# Altium PCB PCB1.PcbDoc (part 3 of 3)
Units mil, origin at the board's own origin, x right, y up, seen from the top; angles counter-clockwise.
Board outline 4825 x 2725 mil, 2 copper layers (Top Layer, Bottom Layer); 148 components, 112 nets, 484 pads, 116 vias.
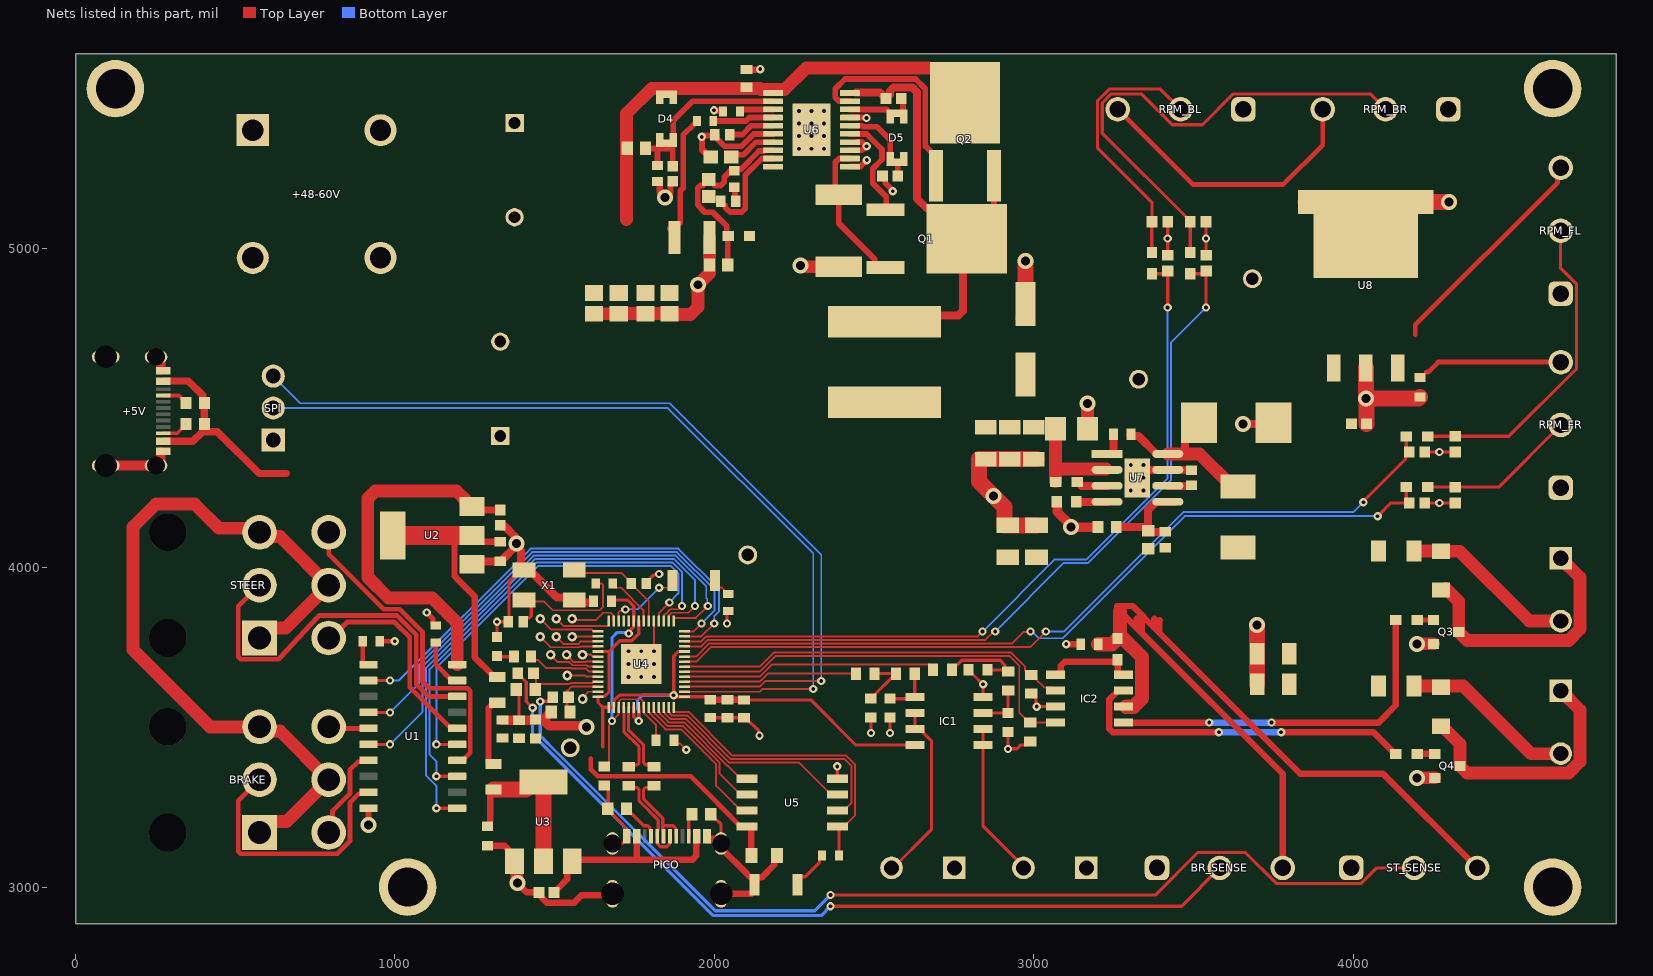
[diagram p2: the nets of this part, all layers, seen from the top]

## Part data (continued)
R34: library part CMP-03412-022575-2, "RES 100KΩ 1.00% 0.1W 0603", Case/Package=0603, Resistance=100kR, Tolerance=1%, RoHS Compliant=Yes
R35: library part CMP-02407-004872-1, "RES Thick Film, 68.1kΩ, 1%, 0.1W, 100ppm/°C, 0603", Case/Package=0603, Manufacturer=YAGEO, Manufacturer Part Number=RC0603FR-0768K1L, Max Operating Temperature=155°C, Max Power Dissipation=100mW, Min Operating Temperature=-55°C, Package Quantity=20000, Resistance=68.1kR, Temperature Coefficient=100ppm/°C, Tolerance=1%, Composition="Thick Film", Contact Plating=Tin, Depth=0.85mm, Features="Automotive AEC-Q200", Height=0.02inch, Lead Free="Lead Free", Length=0.061inch, Military Standard=Not, Number of Terminations=2, Packaging="Tape and Reel", Radiation Hardening=No, Width=0.033inch
R36 R39 R44 R45: library part CMP-03412-031710-1, "RES SMD 5.23K OHM 0.1% 1/10W", Manufacturer=Yageo, Package=RT0603, Power Rating=0.1W, Resistance=5.23KΩ, Temperature="-55°C to +155°C", Temperature Coefficient="25 ppm/°C", Temperature Range High=+155°C, Temperature Range Low=-55°C, Tolerance=0.001, Voltage Rating=75V, Automotive=No, Category=Res, ComponentLink2Description=Datasheet, ComponentLink2URL=http://www.yageo.com/documents/recent/PYu-RT_1-to-0.01_RoHS_L_9.pdf, Composition="Thin Film", Device Class L1="Passive Components", Device Class L2=Resistors, Device Class L3="Chip SMD Resistors", Digikey Description="RES SMD 5.23K OHM 0.1% 1/10W", Footprint Url=http://www.yageo.com/exep/pages/download/literatures/PYu-R_Mount_10.pdf, Height=0.55mm, Ipc Land Pattern Name=RESC16080X45, Lead Free=Yes, Manufacturer Part Number=RT0603BRD075K23L, Mouser Description="Thin Film Resistors 1/10W 5.23K ohm .1% 25ppm", Octopart=https://octopart.com/rt0603brd075k23l-yageo-1448416, RoHS=TRUE, Series=RT
R37 R40 R48 R49: library part CMP-2000-00874-2, "RES SMD 10K OHM 0.1% 1/10W 0603", Case Code (Imperial)=0603, Case Code (Metric)=1608, Max Operating Temperature=155°C, Max Power Dissipation=100mW, Min Operating Temperature=-55°C, Package Quantity=5000, Resistance=10kR, Resistance Tolerance=0.1%, Resistor Type="Thin Film", Temperature Coefficient=25ppm/°C, Voltage Rating=75V, Case/Package=0603, Construction=Rectangular, Contact Plating=Tin, Depth=0.8mm, Height=0.45mm, Lead Free="Lead Free", Length=1.6mm, Military Standard=Not, Mount="Surface Mount", Number of Pins=2, Number of Terminations=2, Packaging="Tape and Reel", Power Rating=100mW, Radiation Hardening=No, REACH SVHC="No SVHC", RoHS Compliant=Yes, Series=ERA-3A, Size Code=0603, Technology="METAL FILM", Termination=SMD/SMT, Tolerance=0.1%, Voltage Rating (DC)=75V, Width=0.8mm
R42 R43: library part CMP-03412-032644-1, "RES SMD 47 OHM 1% 1/10W 0603", Manufacturer=Yageo, Manufacturer Part Number=RT0603FRE0747RL, Package=RT0603, Power Rating=0.1W, Resistance=47Ω, Temperature="-55°C to +155°C", Temperature Coefficient="50 ppm/°C", Temperature Range High=+155°C, Temperature Range Low=-55°C, Tolerance=0.01, Voltage Rating=75V, Automotive=No, Category=Res, ComponentLink2Description=Datasheet, ComponentLink2URL=http://www.yageo.com/documents/recent/PYu-RT_1-to-0.01_RoHS_L_9.pdf, Composition="Thin Film", Device Class L1="Passive Components", Device Class L2=Resistors, Device Class L3="Chip SMD Resistors", Digikey Description="RES SMD 47 OHM 1% 1/10W 0603", Footprint Url=http://www.yageo.com/exep/pages/download/literatures/PYu-R_Mount_10.pdf, Height=0.55mm, Ipc Land Pattern Name=RESC16080X45, Lead Free=Yes, Mouser Description="RT Series 0603 0.1 W 47 Ohm ±1 % ±50 ppm/°C SMT Thin Film Chip Resistor", Octopart=https://octopart.com/rt0603fre0747rl-yageo-39813773, RoHS=TRUE, Series=RT
SPI: library part CMP-04776-000327-1, "CONN HEADER VERT 3POS 2.54MM", Color=Natural, Contact Resistance=10mR, Current Rating=4A, Housing Color=White, Max Operating Temperature=75°C, Min Operating Temperature=0°C, Voltage Rating=250V, Connector Type="Male Pin", Contact Material=Brass, Contact Mating Length=0.295inch, Contact Plating=Gold, Contact Type="Male Pin", Depth=5.8mm, Fastening Type=Friction, Gender=Male, Housing Material=Nylon, Lead Pitch=2.54mm, Length=7.62mm, Mount="Through Hole", Number of Contacts=3, Number of Positions=3, Number of Rows=1, Orientation=Straight, Packaging=Bulk, Pitch=2.54mm, Radiation Hardening=No, RoHS Compliant=Yes, Series="KK® 6410", Termination=Solder, Working Voltage=250V
U1: library part CMP-0440-01048-3, "Octal Buffers/Drivers With 3-State Outputs, NS0020A, LARGE T&R", F @ Nom Voltage(Max)(Mhz)=110, Generic Part Number=SN74AHCT244, ICC @ Nom Voltage(Max)(mA)=0.04, Manufacturer="Texas Instruments", Operating Temperature Range(C)="-40 to 85", Rating=Catalog, tpd @ Nom Voltage(Max)(ns)=9.5, Voltage(Nom)(V)=5, Bits(#)=8, DatasheetVersion=SCLS228M, Input Type=TTL, Output Type=CMOS, PackageReference=NS0020A, PackageVersion=http://www.ti.com/lit/ml/msop002a/msop002a.pdf, VCC(Max)(V)=5.5, VCC(Min)(V)=4.5
U2 U3: library part CMP-019-00054-3, "1A 16V high-PSRR linear voltage regulator 4-SOT-223 -40 to 125", Case/Package=SOT-223, Manufacturer Lifecycle Status=ACTIVE, Height=1.8mm, Length=6.5mm, Lifecycle Status=Production, Pins=4, RoHS=Compliant, Thickness=1.6mm, Width=3.5mm
U4: "Integrated Circuit", Manufacturer_Name=RASPBERRY-PI, Datasheet Link=https://datasheets.raspberrypi.org/rp2040/rp2040-datasheet.pdf, Height=0.9mm, Manufacturer_Part_Number=RP2040
U5: "Integrated Circuit", Manufacturer_Name="Renesas Electronics", Mouser Part Number=988-AT25QF128A-SHB-T, Datasheet Link=https://www.renesas.com/us/en/products/memory-logic/non-volatile-memory/spi-nor-flash/dual-quad-spi-memory/at25qf128a-128mbit-3v-spi-serial-flash-memory-dual-io-and-quad-io-support, Height=2.16mm, Manufacturer_Part_Number=AT25QF128A-SHB-T, Mouser Price/Stock=https://www.mouser.co.uk/ProductDetail/Renesas-Dialog/AT25QF128A-SHB-T?qs=IS%252B4QmGtzzpXzyCQuAC%2FQA%3D%3D
U6: library part CMP-0069-01482-3, "Wide Range Synchronous Buck Controller, 20-pin TSSOP-EP, Pb-Free", Manufacturer="Texas Instruments", PackageTopMarking=NSUZXYTT*LM5116*MH, PowerWise=Y, Code_JEDEC=MO-153-ACT, ComponentLink1Description="Datasheet URL", ComponentLink1URL=http://www.ti.com/general/docs/lit/getliterature.tsp?genericPartNumber=LM5116&fileType=pdf, CompType=Switcher, PackageDescription="Molded TSSOP, Jedec, 6.5 x 4.4 x 0.9mm Body, 20 Lead, 0.65mm Pitch, Exposed Pad", PackageReference=PWP0020A, PinCount=20, RoHS=Y
U7: library part CMP-04918-000376-1, "IC REG BUCK ADJUSTABLE 3A 8SOPWR", Max Operating Temperature=125°C, Min Operating Temperature=-40°C, Quiescent Current=40uA, Lead Free="Lead Free", Number of Pins=8, RoHS Compliant=Yes
U8: "Integrated Circuit", Arrow Part Number=LM7812S/NOPB, Manufacturer_Name="Texas Instruments", Mouser Part Number=595-LM7812S/NOPB, Arrow Price/Stock=https://www.arrow.com/en/products/lm7812snopb/texas-instruments?utm_currency=USD&region=nac, Datasheet Link=http://www.ti.com/lit/gpn/lm7800, Manufacturer_Part_Number=LM7812S/NOPB, Mouser Price/Stock=https://www.mouser.co.uk/ProductDetail/Texas-Instruments/LM7812S-NOPB?qs=9V2QonpqdTtBO5BzoGXA0A%3D%3D
X1: library part CMP-003-00015-2, "Ceramic SMD Crystal, 12 MHz, +/- 20 ppm, 18 pF, -20 to 70 degC, 4-Pin SMD, RoHS, Tape and Reel", Case/Package=CSMD, Frequency=12MHz, Frequency Tolerance=20ppm, Load Capacitance=18pF, Manufacturer=Abracon, Max Operating Temperature=70°C, Min Operating Temperature=-20°C, Package Description="4-Pin Surface Mount Device, Body 5 x 3.2 mm", Package Quantity=1000, Package Reference=ABM3B, Resistance=70Ohm, Datasheet URL=http://www.abracon.com/Resonators/abm3b.pdf, Datasheet Version=Aug-15, ESR=70, Manufacturer URL=http://www.abracon.com/, Mounting Technology=SM, Packaging=TapeandReel, Pins=4, RoHS Compliant=True, Tolerance=20ppm

## Free pads (board coordinates)
  round 180 hole 123: 1(125,5500) 1(1040,3000) 1(4625,3000) 1(4625,5500)

## Via types
v1: diameter 26, hole 12, Top Layer to Bottom Layer, 88 vias
v2: diameter 50, hole 28, Top Layer to Bottom Layer, 17 vias
v3: diameter 30, hole 15, Top Layer to Bottom Layer, 11 vias

## Nets (pads, with @x,y where several pads share a name; then routed paths per layer and width w, separated by ;. In a path a pad name is that pad's centre, name@x,y a point inside that pad or via, vN(x,y) a via of type N, cw(c..) or ccw(c..) an arc to the next point about the centre after c; other vN are vias at no path point)
+1V1: C12.1 C13.1 C17.1 U4.23 U4.45 U4.50 | length 937
  Top Layer w6: C13.1@1655.27,3377.53 1657.24,3377.53 1669.99,3390.28 1669.99,3506.49 1680,3516.5 v1(1680,3520) 1700.52,3540.52 U4.45@1700.52,3562.89 1701.46,3563.83 1701.46,3580.56 1709.02,3588.12 1770.76,3588.12 1778.32,3580.56 1778.32,3563.83 U4.50@1779.26,3562.89 1780.2,3561.96 1780.2,3543.98 1817.84,3506.33 C17.1@1817.84,3460
  Top Layer w10: C12.1@1679.19,3889.35 1679.19,3889.73 1688.56,3899.1 1728.31,3899.1 1747.77,3879.65 U4.23@1747.77,3833.6 1746.7,3832.54 1746.7,3812.98 1732.02,3798.3 v1(1732.02,3794.24)
  Bottom Layer w10: v1(1680,3520) 1680,3781.48 1695.19,3796.67 1729.58,3796.67 v1(1732.02,3794.24)
+3V3: +3.3V.1 C6.1 C8.1 C9.1 C23.1 C26.1 C27.1 C28.1 D1.1 D3.1 IC1.8 U4.1 U4.10 U4.22 U4.33 U4.42 U4.43 U4.44 U4.48 U4.49 U5.8 | length 2929.9
  Top Layer w10: U4.33@1636.03,3737.62 1670.63,3737.62 ; 1650.98,3439.12 1650.98,3562.89 ; U4.48@1747.77,3562.89 1747.77,3533.25 1761.01,3520 v1(1763.51,3520) ; v1@1762.64,3520.88 1763.51,3521.75 U4.49@1763.51,3562.89 ; U4.22@1763.51,3833.6 1763.51,3792.78 1741.97,3771.24 1704.25,3771.24 1670.63,3737.62 ; v1(1872.9,3600.76) 1872.55,3601.12 1703.63,3601.12 1698.4,3595.89 1698.21,3595.89 1685.84,3583.51 1685.84,3563.96 U4.44@1684.77,3562.89 U4.43@1669.02,3562.89 1650.98,3562.89 ; v1@1872.9,3601.12 v1@1873.75,3601.12 ; U4.10@1906.74,3737.62 1887.19,3737.62 1872.9,3723.34 1872.9,3601.96 v1@1873.75,3601.12 ; C23.1@1987.45,3586.37 1978.08,3595.74 1968.23,3595.74 1968.09,3595.89 U4.1@1906.74,3595.89 1882.11,3595.89 1876.88,3601.12 v1@1873.75,3601.12 ; C26.1@2041.01,3586.3 C26.1@2041.07,3586.24 ; C27.1@2093.51,3586.18 2302.08,3586.18 2443.26,3445 IC1.8@2628.23,3445 ; 1650.98,3562.89 1636.03,3577.84 U4.42@1636.03,3595.89 1637.1,3596.95 1656.65,3596.95 1670.63,3610.93 1670.63,3737.62
  Top Layer w15: 1613.17,3402.81 1613.17,3368.49 1634.93,3346.73 1925.76,3346.73 2012.07,3260.42 2012.21,3260.42 2019.53,3253.1 2019.53,3252.95 2083.09,3189.4 U5.8@2102.77,3189.4
  Top Layer w20: D3.1@1308.85,3385.85 1299.02,3385.85 1293.27,3391.59 1293.27,3560.23 1309.24,3576.2 D1.1@1315.97,3576.2 ; C23.1@1987.45,3586.37 C26.1@2040.94,3586.37 ; C26.1@2041.07,3586.24 C27.1@2093.51,3586.18 ; C28.1@2116.2,3098.79 U5.8@2116.2,3181.61
  Bottom Layer w10: v1(1763.51,3520) 1763.51,3552.78 1759.58,3556.72 1759.58,3585.17 1775.17,3600.76 v1(1872.9,3600.76)
+5: +5V.1@2105,4040 +5V.A4-B9 +5V.B4-A9 BR_SENSE.3 BRAKE.1 BRAKE.3 BRAKE.5 C4.1 C37.2 C41.2 C43.2 C45.2 IC2.6 L2.2 R1.2 R2.2 R34.2 R35.1 ST_SENSE.3 STEER.1 STEER.3 STEER.5 U1.20 U2.3 | length 7392.9
  Top Layer w20: 3261.76,3880 3310,3880 3379.53,3810.47 ; 3270.49,3863.91 3319.97,3814.43 ; 3322.4,3840 3322.4,3816.86 3319.97,3814.43 ; 3339.29,3833.82 3339.29,3795.11 ; 3377.67,3840 3377.67,3812.33 3379.53,3810.47 ; 3395,3835 3393.82,3833.82 3393.82,3796.18 ; BR_SENSE.3@3780,3060 3780,3354.4 3339.29,3795.11 ; ST_SENSE.3@4388.7,3060 4093.7,3355 3835,3355 3393.82,3796.18 ; 3319.97,3814.43 3339.29,3795.11 ; 3379.53,3810.47 3393.82,3796.18
  Top Layer w23: +5V.B4-A9@274.84,4395.51 367.58,4395.51 398.1,4426.03 ; +5V.A4-B9@274.84,4584.49 353.49,4584.49 398.1,4539.87 398.1,4520.94 R2.2@403.61,4515.43 R1.2@403.61,4450.47 ; R1.2@398.1,4433.97 398.1,4426.03 ; R1.2@407.17,4444.97 409.11,4443.03 R1.2@409.11,4433.97 ; 659.56,4295 575,4295 443.97,4426.03 398.1,4426.03 ; U2.3@1265.78,4180.46 C4.1@1329.92,4180.46
  Top Layer w40: BRAKE.1@576.1,3170.89 610.23,3205.02 661.41,3205.02 BRAKE.5@792.63,3336.24 640.34,3488.53 603.67,3488.53 590.6,3501.59 BRAKE.3@576.1,3501.59 421.63,3501.59 180.08,3743.15 180.08,4127.71 251.87,4199.5 373.08,4199.5 448.92,4123.67 563.03,4123.67 STEER.3@576.1,4110.6 589.16,4097.54 640.34,4097.54 STEER.5@792.63,3945.25 658.25,3810.87 607.07,3810.87 STEER.1@576.1,3779.9 ; U1.20@1195.12,3696.81 1195.12,3826.75 1116.87,3905 980.04,3905 915,3970.04 915,4216.57 938.43,4240 1192.92,4240 1221.81,4211.11 1221.81,4201.27 1231.34,4191.74 U2.3@1241.18,4191.74
  Top Layer w45: C43.2@3202.56,3760.75 3245.55,3760.75 R34.2@3263.27,3778.46 ; 3270.49,3863.91 3270.49,3785.69 R34.2@3263.27,3778.46 ; IC2.6@3289.29,3565.16 3313.64,3565.16 3339.29,3590.81 3339.29,3720.16 3280.98,3778.46 R34.2@3263.27,3778.46
+12: +12V.1 C50.1 RPM_BL.3 RPM_BR.3 RPM_FL.3 RPM_FR.3 U8.3 | length 2046.2
  Top Layer w15: RPM_BL.3@3263.15,5435 3498.15,5200 3781.59,5200 3905,5323.41 RPM_BR.3@3905,5435 ; 4195,4729.32 4195,4760 4640.37,5205.37 4640.37,5242.22 RPM_FL.3@4650,5251.85 ; 4230,4612.5 4235,4612.5 4266.2,4643.7 RPM_FR.3@4650.41,4643.7
+24: +24V.1 C35.1 C36.2 C38.1 C40.1 C42.1 C47.1 C48.1 C49.1 F1.1 F2.1 L1.2 R20.2 R32.1 U6.10 U7.2 U8.1 | length 321.2
  Top Layer w40: R32.1@3068.2,4269.59 3068.2,4306.34 C42.1@3068.2,4435.14 ; 3071.2,4309.34 U7.2@3226.88,4309.34
+48: +48-60V.3 +48-60V.4 C1.2 C2.2 C11.1 C14.1 C16.1 C18.1 C20.1 C29.1 D4.2 D4.@1829.07,5473.15 D4.@1871.4,5473.15 Q2.2 R12.2 R17.1 U6.1 | length 1920.1
  Top Layer w18: C20.1@1860.34,5062.3 C20.1@1872.7,5074.65 ; C20.1@1874.99,5033.77 1884.69,5071.17 1893.02,5079.5 1893.69,5084.95 1893.69,5179.99 1902.55,5188.85 1902.55,5354.51 1939.27,5391.23 1943.21,5391.23 1946.02,5394.04 R17.1@1946.02,5397.98
  Top Layer w40: 1725,5090 1725,5313.14 1725,5421.73 1804.12,5500.85 1850.24,5500.85 2100.99,5500.85 2143.09,5500.85 2146.63,5497.3 2184.46,5497.3 2220.19,5497.3 2287.89,5565 2671.33,5565 2672.83,5563.5 2694.76,5563.5 2785,5473.27 Q2.2@2785,5455.55
BACK_LEFT_ANALOG: IC1.6 IC1.7 MCont.2 | length 573.3
  Top Layer w10: MCont.2@2555,3055 2680,3180 2680,3458.11 2653.25,3484.87 2653.25,3487.2 2645.45,3495 IC1.7@2628.23,3495 IC1.6@2628.23,3545
BACK_RIGHT_ANALOG: Analog.2 IC1.1 IC1.2 | length 493.4
  Top Layer w10: IC1.2@2841.77,3495 IC1.1@2841.77,3445 2841.77,3190 Analog.2@2975,3056.77
BRAKE_GND: BR_PWR.1 D7.2 Q4.3 | length 801.9
  Top Layer w40: D7.2@4275.41,3503.57 4274.78,3503.57 4273.76,3504.59 4278.32,3504.59 4334.78,3448.13 4334.78,3395.34 Q4.3@4334.78,3379.59 4357.06,3357.31 4675.44,3357.31 4710.84,3392.71 4710.84,3554.16 BR_PWR.1@4650.41,3614.59
BRAKE_POWER: BR_PWR.2 D7.1 F1.2 | length 547.2
  Top Layer w40: F1.2@4191.12,3629.59 D7.1@4275.41,3629.59 ; D7.1@4275.41,3629.24 4301.93,3629.24 4302.28,3629.59 4345.41,3629.59 4557.26,3417.74 BR_PWR.2@4650.41,3417.74
BrakeSense: BR_SENSE.2 R7.2 | length 2660.2
  Top Layer w10: R7.2@1385.06,3669.63 1385.06,3668.62 1411.51,3642.18 1411.51,3581.18 v1(1431.29,3561.37) ; v1(2363.7,2940) 3463.15,2940 BR_SENSE.2@3583.15,3060
  Bottom Layer w10: v1(1431.29,3561.37) 1431.29,3476.65 1997.16,2910.77 2334.47,2910.77 v1(2363.7,2940)
FB: C21.1 R18.2 R20.1 R22.1 U6.8 | length 593.6
  Top Layer w18: R20.1@2038.89,5040.85 2038.89,5069.79 1995.51,5113.17 1970.54,5113.17 1948.13,5135.58 1948.13,5188.52 1956.33,5196.72 1964.32,5196.72 C21.1@1982.8,5215.2 2001.28,5196.72 2020.65,5196.72 2031.19,5207.26 2031.19,5222.74 2054.19,5245.74 R22.1@2054.19,5247.6 ; R18.2@2042.24,4948.03 R20.1@2042.24,5037.5 ; R22.1@2062.75,5242.95 2068.52,5248.72 2084.38,5248.72 2140.1,5304.44 2155.19,5304.44 2157.63,5306.89 2184.32,5306.89 U6.8@2184.46,5307.03
GND: +5V.1@252.2,4660.08 +5V.2 +5V.3 +5V.4 +5V.A1-B12 +5V.B1-A12 +48-60V.1 +48-60V.2 Analog.1 BOOTSEL1.1 BR_SENSE.1 C1.1 C2.1 C3.2 C4.2 C5.2 C6.2 C7.1 C8.2 C9.2 C10.2 C11.2 C12.2 C13.2 C14.2 C15.1 C16.2 C17.2 C18.2 C19.2 C20.2 C22.1 C23.2 C25.1 C26.2 C27.2 C28.2 C29.2 C30.2 C31.1 C33.2 C34.2 C35.2 C36.1 C37.1 C38.2 C39.2 C40.2 C41.1 C42.2 C43.1 C46.2 C47.2 C48.2 C49.2 C50.2 D2.1 D6.2 IC1.4 IC2.3 MCont.1 pad.1 PICO.1 PICO.2 PICO.3 PICO.4 PICO.A1-B12 PICO.B1-A12 Q3.2 Q4.2 R3.1 R4.1 R6.2 R8.2 R11.2 R15.1 R16.2 R18.1 R19.1 R21.1 R23.1 R29.1 R30.1 R31.1 R33.2 R37.2 R38.1 R40.2 R41.1 R46.1 R47.1 R48.2 R49.2 RPM_BL.1 RPM_BR.1 RPM_FL.1 RPM_FR.1 SPI.1 ST_SENSE.1 U1.10 U2.1 U3.1 U4.19 U4.57 U5.4 U6.6 U6.11 U6.13 U6.14 U6.17 U6.21 U7.7 U7.9 U8.2 U8.4 U8.5 U8.6 X1.2 X1.4 | length 8271.4
  Top Layer w6: v1(1771.39,3698.25) 1810.76,3737.62 U4.19@1810.76,3833.6 ; C17.2@1873.75,3460 1884.81,3448.94 1893.6,3448.94 v1(1912.54,3430)
  Top Layer w10: D2.1@1320,3779.11 v1(1320,3830.55) C7.1@1355.24,3830.55 1357.49,3832.79 1357.49,3957.44 1373.87,3973.82 1373.87,3974.32 1392.49,3992.94 X1.2@1404.3,3992.94 ; R6.2@1380.17,3618.72 1379.87,3618.72 1378.93,3617.79 1388.49,3608.23 C8.2@1388.49,3522.14 C8.2@1388.49,3522 ; C13.2@1655.27,3318.48 1657.24,3318.48 1667.99,3307.73 R11.2@1667.99,3245.46 ; R11.2@1666.29,3245.46 1666.29,3243.49 1718.54,3191.24 1718.54,3166.01 PICO.A1-B12@1725.35,3159.2 ; PICO.1@1681.26,3136.56 1712.22,3136.56 1717.22,3141.56 1718.54,3141.56 1725.35,3148.37 PICO.A1-B12@1725.35,3149.69 ; C15.1@1787.14,3950.44 1787.14,3953.39 1811.04,3977.3 1824.5,3977.3 v1(1827.44,3980.24) ; C23.2@1987.45,3530.47 1987.49,3530.43 C26.2@2036.8,3530.43 ; R16.2@1989.32,3228.23 1989.32,3226.26 2002.03,3213.55 2004,3213.55 2021.41,3196.14 PICO.2@2021.41,3149.06 ; v1(2040,3825) 2040,3860.11 R21.1@2044,3864.11 ; C26.2@2041.01,3530.4 C27.2@2085.73,3530.4 ; C27.2@2093.51,3530.28 2097.65,3530.28 2138.86,3489.06 2138.86,3477.27 v1(2141.92,3474.21) ; v1(2385.02,3377.87) 2385.02,3340.62 U5.4@2386.24,3339.4 ; v1(2490.47,3482.2) C30.2@2490.47,3530.86 ; v1(2550,3482.2) C33.2@2550,3530.86 ; C34.2@2795.94,3680 2795.94,3678.03 2806.69,3667.28 2808.66,3667.28 v1@2840.94,3635 ; IC1.4@2841.77,3595 v1(2841.77,3635) ; C39.2@2920,3485.47 v1(2920,3432.2) 2920.8,3433 2948,3433 2960.2,3445.2 2979.25,3445.2 R29.1@2990,3455.94 ; R30.1@2990,3605.47 R30.1@2991.97,3605.47 2993.94,3605.47 3004.69,3594.72 3004.69,3590.79 3006.94,3588.53 3006.94,3568.06 v1(3010,3565) 3063.5,3565 3068.23,3560.28 IC2.3@3068.23,3565 ; R38.1@3419.63,4978.29 v1(3419.63,5030.97) R37.2@3419.63,5083.66 ; R41.1@3540,4978.29 v1(3540,5030.97) R40.2@3540,5083.66 ; R46.1@4225,4197.16 4230.37,4202.53 v1(4270.37,4202.53) R48.2@4320.37,4202.53 ; R47.1@4225,4362.22 v1(4270.37,4362.22) R49.2@4320.37,4362.22
  Top Layer w15: R3.1@952.76,3769.55 v1(999.65,3769.52) 999.95,3769.52 v1@1000.1,3769.37 ; v1(1100,3860) 1119.37,3840.63 1119.37,3824.54 1124.84,3819.08 R4.1@1127.86,3819.08
  Top Layer w18: C25.1@2007.16,5356.04 2007.16,5344.85 2032.22,5319.79 2085.33,5319.79 2123.75,5358.21 U6.6@2184.46,5358.21 ; U6.11@2424.62,5255.85 2424.76,5255.99 2458.18,5255.99 2477.32,5275.12 v1(2477.32,5276.08) ; U6.13@2424.62,5307.03 2462.86,5307.03 2475.47,5319.64 v1(2477.15,5319.64) ; U6.17@2424.62,5409.39 2424.76,5409.25 2475.51,5409.25 v1(2476.77,5407.98) ; U6.14@2446.97,5332.62 2462.86,5332.62 2475.59,5319.89 v1@2475.73,5319.89 ; C31.1@2527.22,5226.23 2535.11,5218.34 2535.11,5204.92 2559.13,5180.9 v1(2559.13,5178.73)
  Top Layer w20: v2(917.57,3195) U1.10@917.57,3246.81 ; C3.2@1290,3129.49 1343.21,3129.49 1354.92,3117.77 1354.92,3110.35 U3.1@1378.99,3086.29 ; v2(1383.58,3012.21) 1412.31,2983.48 C10.2@1451.08,2983.48 1451.08,2975 1451.91,2975 1475.4,2951.51 1562.11,2951.51 1585.6,2975 1677.18,2975 PICO.3@1681.26,2979.08 ; R15.1@1822.26,5209.67 1825.22,5209.67 1829,5205.9 1829,5175.92 v2(1846.33,5158.58) 1862.89,5175.14 1862.89,5202.94 1869.78,5209.82 C19.2@1869.86,5209.82 ; C22.1@1988.41,5285.81 1985.54,5285.81 1961.78,5309.56 1961.78,5347.8 v1(1960.63,5348.95) 1962.25,5348.95 1966.42,5353.11 1998.86,5353.11 C25.1@2001.4,5355.65 ; v1(1999.16,5432.29) 2000.31,5431.15 2024.69,5431.15 R19.1@2027.14,5428.69 ; PICO.4@2021.41,2979.08 2115.47,2979.08 2126.11,2989.71 BOOTSEL1.1@2126.11,3007.43 BOOTSEL1.1@2126.11,3025.15 ; PICO.2@2021.41,3136.56 2021.41,3122.53 2028.32,3115.63 2093.14,3050.81 2113.05,3030.89 2120.36,3030.89 BOOTSEL1.1@2126.11,3025.15 ; C29.2@2100.99,5560.14 2101.95,5559.18 2140.44,5559.18 2142.33,5561.06 v1(2143.95,5561.06) ; BOOTSEL1.1@2126.11,3017.84 BOOTSEL1.1@2126.11,3025.15 ; BOOTSEL1.1@2131.85,3030.89 2149.57,3030.89 2188.08,3069.41 2188.08,3089.97 C28.2@2196.91,3098.79 ; v1(3102.09,3760.75) C43.1@3147.44,3760.75
  Top Layer w25: U2.1@1241.18,4010.64 1250.38,4019.83 C5.2@1324.81,4019.83 ; C4.2@1329.92,4133.05 1334.31,4128.66 1345.24,4128.66 1375.42,4098.48 1375.42,4080.01 v2(1380.21,4075.23) v2@1380.21,4068.91 ; C5.2@1330,4020.56 C5.2@1332.95,4020.56 ; C5.2@1335.22,4018.3 C5.2@1332.95,4020.56 ; C12.2@1623.28,3889.35 1623.28,3889.85 1621.41,3891.72 1571.04,3891.72 1556.36,3906.4 1507.65,3906.4 1432.23,3981.82 1415.42,3981.82 X1.2@1404.3,3992.94 1394.61,4002.62 1394.61,4054.06 1380.21,4068.46 v2@1380.21,4068.91 ; PICO.B1-A12@1977.32,3159.2 1977.32,3149.75 1978.01,3149.06 PICO.2@2014.77,3149.06 ; U7.9@3346.94,4306.34 U7.7@3420.12,4306.34 C46.2@3492.65,4306.34 ; v2(3655,4450) 3746.97,4450 D6.2@3750.56,4453.59 ; C5.2@1332.95,4020.56 1335.22,4022.83 1335.22,4023.92 v2@1380.21,4068.91
  Top Layer w30: +5V.4@94.72,4319.92 241.1,4319.92 242.41,4321.24 243.73,4319.92 +5V.2@252.2,4319.92 ; +5V.2@262.88,4319.92 267.2,4324.25 +5V.B1-A12@267.2,4360.83 ; +5V.1@262.88,4660.08 267.2,4655.75 +5V.A1-B12@267.2,4619.17 ; C6.2@1336.28,3522 C8.2@1388.49,3522 ; C8.2@1388.49,3522.14 C9.2@1438.44,3522.14 ; C9.2@1440.54,3524.23 1441.28,3524.98 1466.27,3524.98 1484.74,3543.46 1486.71,3543.46 1489.43,3546.17 R8.2@1489.43,3548.14 ; 1466.27,3522 1483.65,3504.63 1595.47,3504.63 v2(1599.3,3500.8) ; R31.1@3072.09,4206.34 3074,4204.44 3074,4174.83 3116.35,4132.48 v2(3116.35,4127.06) R33.2@3201.16,4127.06
  Top Layer w40: U3.1@1374.45,3080.98 1381.67,3073.76 1381.67,3014.12 v2(1383.58,3012.21) ; C11.2@1623.22,4795.3 1623.58,4794.94 C14.2@1701.99,4794.94 ; C14.2@1700.88,4795.66 C16.2@1778.57,4795.66 ; C16.2@1778.93,4795.3 C16.2@1778.57,4795.66 ; C18.2@1859.15,4795.66 C16.2@1778.57,4795.66 ; C18.2@1860,4792.49 1925.98,4792.49 1949.41,4815.92 v2(1949.41,4885.92) 1985.16,4921.67 R18.1@1985.16,4948.03 ; R18.1@1985.16,4948.03 C20.2@1985.19,5033.74 ; v2(2269.85,4945.87) 2272.55,4945.87 2275.83,4942.6 R23.1@2389.69,4942.6 ; C42.2@3168.64,4435.14 v2(3168.64,4513.59) ; v2(4200.41,3342.19) Q4.2@4256.04,3342.19 ; v2(4200.96,3761.56) Q3.2@4252.2,3761.56
  Top Layer w50: C36.1@2968.5,4781.34 2975,4787.83 C36.1@2975,4825.24 v2(2975,4960) ; C41.1@3008.85,4132.8 C37.1@2918.85,4132.8 2908.66,4132.8 2908.33,4133.12 2908.33,4190.41 v2(2874.45,4224.3) 2829.29,4269.45 2829.29,4339.77 C35.2@2850,4339.77 C38.2@2925,4339.77 C40.2@3000,4339.77 C40.2@3008.85,4339.77 ; C47.2@3699.77,3635 C48.2@3699.77,3730 v2(3699.77,3820) ; U8.6@3851.71,5145.28 3939.8,5145.28 U8.4@4040,5045.08 4140.2,5145.28 U8.5@4228.29,5145.28 4299.72,5145.28 v2(4300,5145) ; U8.2@4040,4625 v2(4040,4530) 4205.51,4530 C50.2@4210,4534.49 ; C49.2@4042.65,4450.59 v2@4042.65,4527.35
  other v1: 1731.39,3658.25 1771.39,3658.25 1811.39,3658.25 1731.39,3698.25 1811.39,3698.25 1731.39,3738.25 1771.39,3738.25 1811.39,3738.25 3303.82,4241.47 3343.82,4241.47 3303.82,4281.47 3343.82,4281.47 3303.82,4321.47 3343.82,4321.47 2265.17,5311.95 2304.54,5311.95 2343.91,5311.95 2265.17,5351.32 2304.54,5351.32 2343.91,5351.32 2265.17,5390.69 2304.54,5390.69 2343.91,5390.69 2265.17,5430.06 2304.54,5430.06 2343.91,5430.06
GPIO0: SPI.2 U4.2 | length 2711
  Top Layer w6: U4.2@1906.74,3611.63 2142.38,3611.63 2150.74,3620 v1(2310,3620)
  Bottom Layer w6: SPI.2@619.21,4500 1855,4500 2310,4045 v1(2310,3620)
GPIO1: SPI.3 U4.3 | length 2778.3
  Top Layer w6: U4.3@1906.74,3627.38 2142.28,3627.38 2159.9,3645 v1(2335,3645)
  Bottom Layer w6: SPI.3@619.21,4600 704.21,4515 1860,4515 2335,4040 v1(2335,3645)
GPIO2: R25.1 U4.4 | length 547
  Top Layer w6: U4.4@1906.74,3643.13 2142.47,3643.13 2167.85,3668.5 R25.1@2443.23,3668.5
GPIO3: R27.1 U4.5 | length 803.6
  Top Layer w6: U4.5@1906.74,3658.88 2142.66,3658.88 2180.47,3696.69 2672.72,3696.69 2685.47,3683.94 R27.1@2685.47,3680
GPIO4: IC2.4 R29.2 U4.6 | length 1355.4
  Top Layer w6: U4.6@1906.74,3674.63 1914.06,3674.63 1915,3675.56 1915.94,3674.63 2142.86,3674.63 2192.23,3724 2924.15,3724 2954.86,3693.28 2954.86,3546.2 2986.06,3515 3020,3515 IC2.4@3068.23,3515
GPIO5: IC2.2 R30.2 U4.7 | length 1238.5
  Top Layer w6: U4.7@1906.74,3690.37 2143.05,3690.37 2187.67,3735 2928.7,3735 2973.31,3690.39 2973.31,3677.28 2985.96,3664.63 R30.2@2990,3664.63 ; R30.2@2990,3664.53 2995.91,3664.53 3008.65,3651.78 3008.65,3649.81 3034.07,3624.39 3058.84,3624.39 IC2.2@3068.23,3615
GPIO6: R45.1 R47.2 U4.8 | length 2588.6
  Top Layer w6: U4.8@1906.74,3706.12 1944.02,3706.12 1989.9,3752 2990.21,3752 v1(3038.21,3800)
  Top Layer w10: v1@4040,4215 4163.9,4338.9 4163.9,4350.39 R47.2@4175.74,4362.22 4166.9,4371.06 R45.1@4166.9,4411.49
  Bottom Layer w6: v1(3038.21,3800) 3094.63,3800 3469.63,4175 4002.33,4175 v1(4032.33,4205)
GPIO7: R44.1 R46.2 U4.9 | length 2532
  Top Layer w6: U4.9@1906.74,3721.87 1943.54,3721.87 1984.67,3763 2932.38,3763 2968,3798.62 2988.62,3798.62 v1(2990,3800)
  Top Layer w10: v1(4077.16,4161.35) 4118.34,4202.53 R46.2@4175.74,4202.53 ; R46.2@4166.9,4205.99 R44.1@4166.9,4252.53
  Bottom Layer w6: v1(2990,3800) 2995.06,3800 3016.06,3779 3090.64,3779 3472.99,4161.35 v1(4077.16,4161.35)
GPIO8: R39.1 R41.2 U4.11 | length 2492.5
  Top Layer w6: U4.11@1906.74,3753.37 1959.48,3753.37 1980.11,3774 2849,3774 2875,3800 v1(2880,3800)
  Top Layer w10: R39.1@3490.37,4920.19 3531.17,4920.19 R41.2@3540,4929.03 v1(3540,4815)
  Bottom Layer w6: v1(2880,3800) 3095,4015 3170.56,4015 3430.63,4275.08 3430.63,4705.63 v1(3540,4815)
GPIO9: R36.1 R38.2 U4.12 | length 2424.5
  Top Layer w6: U4.12@1906.74,3769.11 1959.67,3769.11 1975.56,3785 2825,3785 v1(2840,3800)
  Top Layer w10: R36.1@3370,4920.19 3410.8,4920.19 R38.2@3415.22,4924.61 ; v1(3419.63,4815) 3419.63,4920.19 R38.2@3415.22,4924.61 ; R38.2@3419.63,4929.03 R38.2@3415.22,4924.61
  Bottom Layer w6: v1(2840,3800) 3066,4026 3166,4026 3419.63,4279.63 v1(3419.63,4815)
GPIO10: U1.2 U4.13 | length 1545.3
  Top Layer w6: U4.13@1906.74,3784.86 1907.54,3784.86 1907.68,3785 1907.82,3784.86 1959.86,3784.86 v1(2000,3825)
  Top Layer w10: U1.2@917.57,3646.81 v1(985,3646.81)
  Bottom Layer w6: v1(985,3646.81) 1011.81,3646.81 1425,4060 1887.78,4060 2015,3932.78 2015,3863.71 2000,3848.71 v1(2000,3825)
GPIO11: U1.4 U4.14 | length 1560.6
  Top Layer w6: U4.14@1906.74,3800.61 1935.61,3800.61 v1(1960,3825)
  Top Layer w10: U1.4@917.57,3546.81 v1(985,3546.81)
  Bottom Layer w6: v1(985,3546.81) 1076,3637.81 1076,3695.44 1429.56,4049 1883.23,4049 2001,3931.23 2001,3866 v1(1960,3825)
GPIO12: U1.6 U4.15 | length 1619.9
  Top Layer w6: U4.15@1873.75,3833.6 1873.75,3841.66 1874.69,3842.6 1942.6,3842.6 v1(1980,3880)
  Top Layer w10: U1.6@930.65,3446.81 v1(985,3446.81)
  Top Layer w15: U1.6@917.57,3446.81 929.35,3446.81 930,3447.46 U1.6@930.65,3446.81
  Bottom Layer w6: v1(985,3446.81) 1087,3548.81 1087,3690.89 1434.11,4038 1878.67,4038 1975,3941.67 1975,3905 1978,3902 1978,3882 v1(1980,3880)
GPIO13: U1.11 U4.16 | length 1720.4
  Top Layer w6: U4.16@1858,3833.6 1858.94,3834.54 1858.94,3851.27 1866.57,3858.9 1918.9,3858.9 v1(1940,3880)
  Top Layer w10: v1(1130,3246.81) U1.11@1195.12,3246.81
  Bottom Layer w6: v1(1130,3246.81) 1130,3317.11 1098,3349.11 1098,3686.33 1438.67,4027 1874.11,4027 1940,3961.11 v1(1940,3880)
GPIO14: U1.13 U4.17 | length 1541.4
  Top Layer w6: U4.17@1842.25,3833.6 1843.19,3834.54 1843.19,3851.27 1861.82,3869.9 1888.43,3869.9 v1(1898.88,3880.34)
  Top Layer w10: v1(1130,3346.81) U1.13@1195.12,3346.81
  Bottom Layer w6: v1(1130,3346.81) 1130,3393.37 1109,3414.37 1109,3681.77 1443.23,4016 1869.56,4016 1898.88,3986.68 v1(1898.88,3880.34)
GPIO15: U1.15 U4.18 | length 1378.5
  Top Layer w6: U4.18@1826.51,3833.6 1827.44,3834.54 1827.44,3858.8 v1(1859.39,3890.75)
  Top Layer w10: v1(1130,3446.81) U1.15@1195.12,3446.81
  Bottom Layer w6: v1(1130,3446.81) 1130,3687.22 1447.78,4005 1865,4005 1887.88,3982.12 1887.88,3919.24 v1(1859.39,3890.75)
GPIO16: U4.27 | length 160.9
  Top Layer w6: v3(1555,3840) 1558.72,3836.28 1629.96,3836.28 1652.5,3858.83 1676.28,3858.83 1683.84,3851.27 1683.84,3834.54 U4.27@1684.77,3833.6
GPIO17: U4.28 | length 187.5
  Top Layer w6: v3@1505.18,3838.6 1506.4,3838.6 1528,3817 1665.71,3817 1669.02,3820.31 U4.28@1669.02,3833.6
  other v3: 1505,3840
GPIO18: U4.29 | length 182.4
  Top Layer w6: v3(1455,3840) 1488,3807 1616.02,3807 U4.29@1621.5,3801.52
GPIO19: U4.30 | length 81
  Top Layer w6: v3@1555.31,3784.72 1555.6,3784.43 1635.6,3784.43 U4.30@1636.03,3784.86
  other v3: 1555,3784
GPIO20: U4.31 | length 144.9
  Top Layer w6: v3@1504.04,3784.08 1504.92,3784.08 1528,3761 1574.56,3761 1582.68,3769.11 U4.31@1636.03,3769.11
  other v3: 1505,3784
GPIO21: U4.32 | length 195.4
  Top Layer w6: v3@1454.94,3783.22 1455.78,3783.22 1488,3751 1578.71,3751 1581.07,3753.37 U4.32@1636.03,3753.37
  other v3: 1455,3784
GPIO22: U4.34 | length 50.9
  Top Layer w6: v3(1587.52,3727.57) 1613.61,3727.57 1618.37,3722.81 1635.1,3722.81 U4.34@1636.03,3721.87
GPIO23: U4.35 | length 109.5
  Top Layer w6: v3@1536.51,3727.08 1538.01,3727.08 1560.52,3704.57 1597.05,3704.57 1598.6,3706.12 U4.35@1636.03,3706.12
  other v3: 1537.52,3727.57
GPIO24: U4.36 | length 164.3
  Top Layer w6: v3@1486.95,3727.05 1488.04,3727.05 1510.52,3704.57 1546.38,3704.57 1556.38,3694.57 1601.48,3694.57 1605.68,3690.37 U4.36@1636.03,3690.37
  other v3: 1487.52,3727.57
GPIO25: R5.1 U4.37 | length 229.1
  Top Layer w6: R5.1@1426.34,3721.48 1436.66,3711.16 1447.57,3711.16 1472.34,3686.39 1550.42,3686.39 1552.24,3684.57 1597.34,3684.57 1606.35,3675.56 1635.1,3675.56 U4.37@1636.03,3674.63
GPIO26_ADC0: U4.38 | length 97.9
  Top Layer w6: v3(1539.59,3662.4) 1595.24,3662.4 1598.76,3658.88 U4.38@1636.03,3658.88
GPIO27_ADC1: R6.1 R7.1 U4.39 | length 261.2
  Top Layer w6: R6.1@1425.93,3620.04 R6.1@1441.29,3635.41 ; R7.1@1441.29,3676.98 R6.1@1441.29,3635.41 ; U4.39@1636.03,3643.13 1622.75,3643.13 1618.93,3639.32 1550.5,3639.32 1546.59,3635.41 R6.1@1441.29,3635.41
GPIO28_ADC2: R8.1 R9.1 U4.40 | length 172.1
  Top Layer w6: 1539.07,3613.74 1552.71,3627.38 U4.40@1636.03,3627.38
  Top Layer w10: 1539.07,3613.74 1539.07,3594.88 1539.07,3557.56 R8.1@1548.48,3548.14
GPIO29_ADC3: U4.41 | length 60.3
  Top Layer w6: v3(1587.66,3588.88) 1587.66,3593.2 1606.09,3611.63 U4.41@1636.03,3611.63
NetC3_1: C32.1 D5.2 D5.@2550.84,5413.26 D5.@2593.17,5413.26 U6.18 | length 190.7
  Top Layer w18: U6.18@2424.62,5434.98 2539.45,5434.98 D5.2@2551.34,5423.1 ; C32.1@2585.23,5468.99 2590.85,5463.37 2590.85,5415.57 D5.@2593.17,5413.26
NetC3_2: C32.2 L1.1 Q1.2 Q2.3 U6.20 | length 1519.9
  Top Layer w18: Q1.2@2792.52,5020 2875.55,5103.03 Q2.3@2875.55,5227.2
  Top Layer w25: U6.20@2443.61,5487.53 2519.35,5487.53 C32.2@2537.81,5469.07 ; C32.2@2537.81,5468.99 C32.2@2537.81,5469.07 ; L1.1@2542.17,4789.65 2764.12,4789.65 2778.77,4804.29 Q1.2@2778.77,4995.76 ; Q1.2@2750.98,5061.54 ccw(c2864,5065.86) Q1.2@2775.24,4995.76 ; Q1.2@2792.52,5020 2784.2,5028.32 2685.77,5126.75 2663.95,5126.75 2635.26,5155.44 2635.26,5488.81 2620.62,5503.46 2561.1,5503.46 2550.84,5493.21 2550.84,5482.1 C32.2@2537.81,5469.07
NetC10_2: C22.2 U6.7 | length 150.3
  Top Layer w18: C22.2@2053.53,5285.81 2060.81,5293.09 2091.15,5293.09 2130.54,5332.48 2184.32,5332.48 U6.7@2184.46,5332.62
NetC11_2: C25.2 U6.5 | length 152.8
  Top Layer w18: C25.2@2042.88,5356.74 2088.34,5356.74 2115.4,5383.8 U6.5@2184.46,5383.8
NetC18_1: C21.2 C24.1 U6.9 | length 346.1
  Top Layer w18: C21.2@1982.8,5162.05 1989.95,5154.89 2014.14,5154.89 2019.9,5149.13 C24.1@2019.9,5147.74 ; C24.1@2027.14,5140.5 2034.66,5132.97 2034.66,5127.94 2046.58,5116.02 2047.36,5116.02 2049.91,5113.47 2086.16,5113.47 2096.71,5124.02 2096.71,5228.52 2149.63,5281.44 U6.9@2184.46,5281.44
NetC18_2: C24.2 R22.2 | length 45.9
  Top Layer w20: R22.2@2062.75,5191.77 2064.95,5189.57 2064.95,5149.93 C24.2@2067.14,5147.74
NetC19_1: C19.1 D4.1 D4.@1829.07,5339.29 D4.@1871.4,5339.29 R12.1 R15.2 U6.2 | length 617.4
  Top Layer w18: R12.1@1787.94,5314.89 1790.53,5312.29 1822.26,5312.29 ; R15.2@1822.26,5258.89 1822.26,5311.72 1869.86,5311.72 ; C19.1@1869.86,5257.24 1869.86,5311.72 ; U6.2@2184.46,5460.57 1932.03,5460.57 1871.4,5399.94 1871.4,5329.45 1869.86,5327.91 1869.86,5311.72
NetC22_1: C44.1 U7.1 | length 80.8
  Top Layer w25: U7.1@3229.87,4356.34 3249.46,4356.34 3249.71,4356.59 C44.1@3249.71,4417.42
NetC22_2: C44.2 D6.1 L2.1 U7.8 | length 466.2
  Top Layer w25: C44.2@3303.55,4417.42 3303.55,4414.77 3306.11,4412.21 3328.55,4412.21 3383.66,4357.1 3383.66,4356.85 U7.8@3383.91,4356.59 ; 3473.27,4356.34 D6.1@3473.27,4453.59 ; L2.1@3621.99,4254.08 L2.1@3639.42,4254.08
  Top Layer w40: U7.8@3420.12,4356.34 3473.27,4356.34 3519.73,4356.34 L2.1@3621.99,4254.08
NetC26_1: C5.1 D1.2 U2.2 U2.4 | length 865.4
  Top Layer w20: U2.2@1204.89,4113.16 1186.81,4095.08 1186.81,3974.89 1192.92,3968.79 1192.92,3967.08 1250,3910 1250,3718.99 1304.41,3664.58 1304.41,3662.86 1310.16,3657.12 D1.2@1320,3657.12 ; U2.2@1241.18,4101.19 1260.71,4081.66 1282.19,4081.66 1282.27,4081.59 C5.1@1330,4081.59
  Top Layer w50: U2.2@1221.65,4101.19 U2.2@1241.18,4101.19
  Top Layer w59: U2.4@993.15,4101.19 1192.92,4101.19 ; 1196.97,4101.19 U2.2@1221.65,4101.19
NetC29_1: C45.1 R33.1 R35.2 U7.5 | length 316.9
  Top Layer w25: R33.1@3258.59,4127.06 3346.94,4127.06 3358.19,4115.81 R35.2@3358.73,4115.81 ; C45.1@3412.06,4112.3 3362.28,4112.25 R35.2@3358.73,4115.81 ; U7.5@3440.49,4206.09 3383.91,4206.09 3358.73,4180.9 3358.73,4127.06 R35.2@3358.73,4115.81
NetC30_1: C3.1 D3.2 U3.2 U3.4 | length 552.8
  Top Layer w20: C3.1@1290,3190.51 1292.95,3190.51 1297.72,3195.28 1297.72,3205.7 1299.01,3206.99 1299.01,3300.1 1304.76,3305.85 D3.2@1308.85,3305.85
  Top Layer w50: D3.2@1308.85,3305.85 1410.23,3305.85 1438.97,3334.59 U3.4@1474.41,3334.59 ; U3.2@1465,3080.98 U3.4@1465,3329.02
NetC31_1: C10.1 PICO.A4-B9 PICO.B4-A9 U3.3 | length 649.2
  Top Layer w20: C10.1@1498.5,2983.48 1498.5,2983.57 1505.38,2990.45 1505.47,2990.45 1540.11,3025.1 1540.11,3061.72 U3.3@1557.47,3079.07 ; U3.3@1555.55,3080.98 1560.69,3086.12 1754.4,3086.12 1756.85,3088.57 PICO.A4-B9@1756.85,3159.2 ; 1756.85,3086.12 1932.3,3086.12 1944.01,3097.84 1944.01,3157.38 PICO.B4-A9@1945.82,3159.2
NetC43_1: C46.1 U7.6 | length 73.9
  Top Layer w25: U7.6@3420.12,4256.34 C46.1@3494.03,4256.34
NetC44_1: C30.1 R25.2 R26.1 | length 177.3
  Top Layer w10: C30.1@2490.55,3589.91 2490.55,3590.38 R26.1@2568.68,3668.5 R25.2@2502.28,3668.5
NetC45_1: C33.1 IC1.5 R26.2 | length 153.3
  Top Layer w10: C33.1@2550,3589.91 2623.14,3589.91 IC1.5@2628.23,3595 ; IC1.5@2627.74,3595.49 R26.2@2627.74,3668.5
NetC46_1: C34.1 R27.2 R28.1 | length 279.2
  Top Layer w10: R27.2@2744.53,3680 2774.53,3710 2895,3710 2910,3695 2910,3684.53 R28.1@2914.53,3680 ; C34.1@2855,3680 R28.1@2914.53,3680 ; R28.1@2914.53,3680 2920,3680 R28.1@2920,3674.53 R28.1@2914.53,3680
NetC47_1: C39.1 IC1.3 R28.2 | length 149.6
  Top Layer w10: IC1.3@2841.77,3545 2920,3545 C39.1@2920,3544.53 R28.2@2920,3615.47
NetC49_2: C7.2 R10.1 X1.3 | length 426.2
  Top Layer w6: X1.3@1417.71,3894.67 1465.96,3894.67 1493.81,3866.83 1641.43,3866.83 1651.1,3876.49 1651.1,3946.71 1647.58,3950.22 R10.1@1628.52,3950.22
  Top Layer w10: C7.2@1402.49,3830.55 1402.49,3833.5 1412.25,3843.26 1420.93,3843.26 1426.79,3849.12 1426.79,3885.59 X1.3@1417.71,3894.67
NetD4_2: D2.2 R5.2 | length 53.9
  Top Layer w10: D2.2@1320,3723.3 1321.82,3721.48 R5.2@1373.19,3721.48
NetIC1_1: IC2.1 IC2.8 R34.1 | length 286.6
  Top Layer w20: IC2.1@3068.23,3665 3082.39,3665 3085.19,3667.8 3085.19,3693.28 3096.9,3705 3257.52,3705 3263.27,3710.75 R34.1@3263.27,3711.54 ; R34.1@3263.27,3705 3263.27,3667.8 3266.06,3665 IC2.8@3281.77,3665
NetIC1_5: IC2.5 R43.1 | length 1142
  Top Layer w20: IC2.5@3281.77,3515 v1(3550,3515) ; v1(3745,3515) 4080,3515 4134.03,3569.03 R43.1@4134.03,3836.36
  Bottom Layer w20: v1(3550,3515) v1(3745,3515)
NetIC1_7: IC2.7 R42.1 | length 1077.7
  Top Layer w20: IC2.7@3281.77,3615 3264.55,3615 3236.75,3587.2 3236.75,3495.99 3247.74,3485 v1(3580,3485) ; v1(3775,3485) 4064.06,3485 4126.32,3422.74 4128.28,3422.74 R42.1@4134.03,3416.99
  Bottom Layer w20: v1(3580,3485) v1(3775,3485)
NetJ7_A5: +5V.A5 R2.1 | length 82.3
  Top Layer w12: +5V.A5@274.84,4539.21 324.33,4539.21 346.17,4517.37 R2.1@346.17,4515.43
NetJ7_B5: +5V.B5 R1.1 | length 84.6
  Top Layer w12: +5V.B5@274.84,4421.1 318.74,4421.1 346.17,4448.53 R1.1@346.17,4450.47
NetJ11_A5: PICO.A5 R11.1 | length 127.1
  Top Layer w10: R11.1@1725.35,3245.46 1725.35,3243.49 1738.07,3230.77 1740.04,3230.77 1778.97,3191.83 1792.48,3191.83 1798.34,3185.98 1798.34,3179.71 1802.12,3175.93 PICO.A5@1802.12,3159.2
NetJ11_B5: PICO.B5 R16.1 | length 73.2
  Top Layer w10: PICO.B5@1920.23,3159.2 1920.23,3218.2 R16.1@1930.26,3228.23
NetQ1_1: Q2.1 U6.19 | length 670.5
  Top Layer w18: U6.19@2424.62,5460.57 2424.48,5460.71 2391.06,5460.71 2379.12,5472.65 2379.12,5499.68 2409.44,5530 2630.14,5530 2660.76,5499.38 2660.76,5319.94 2694.45,5286.26 Q2.1@2694.45,5227.2
NetQ2_1: Q1.1 U6.15 | length 350
  Top Layer w18: U6.15@2424.62,5358.21 2424.76,5358.07 2455.98,5358.07 2456.06,5357.98 2476.99,5357.98 2525.52,5309.44 2525.52,5278.18 2496.34,5249 2496.34,5203.46 2538.58,5161.21 Q1.1@2538.58,5110.16
NetQ2_3: Q1.3 R23.2 U6.12 | length 471
  Top Layer w18: U6.12@2424.62,5281.44 2402.26,5281.44 2402.12,5281.3 2391.06,5281.3 2379.12,5269.36 2379.12,5177.96 R23.2@2389.69,5167.4 2389.69,5078.74 2502.44,4965.98 2502.44,4940.53 2513.13,4929.84 Q1.3@2538.58,4929.84
NetQ3_1: Q3.1 R43.2 | length 116.5
  Top Layer w15: Q3.1@4245.72,3836.36 Q3.1@4252.2,3829.88 ; Q3.1@4252.2,3836.36 R43.2@4200.96,3836.36 Q3.1@4257.06,3836.36
NetQ4_1: Q4.1 R42.2 | length 55.1
  Top Layer w20: R42.2@4200.96,3416.99 Q4.1@4256.04,3416.99
NetR13_2: R17.2 U6.4 | length 192
  Top Layer w18: R17.2@1997.2,5397.98 1999.28,5397.98 2000.01,5398.71 2099.19,5398.71 2109.88,5409.39 U6.4@2184.46,5409.39
NetR14_2: R19.2 U6.3 | length 108
  Top Layer w18: R19.2@2080.43,5428.69 2080.43,5431.01 2084.39,5434.98 U6.3@2184.46,5434.98
NetR23_2: R32.2 U7.3 | length 85.3
  Top Layer w25: R32.2@3146.28,4260.41 3150.35,4256.34 U7.3@3229.87,4256.34
NetR26_1: R14.1 U4.47 | length 231.6
  Top Layer w10: U4.47@1732.02,3562.89 1731.14,3562.02 1731.14,3492.35 1778.68,3444.81 1778.68,3388.8 1784.54,3382.94 1805.23,3382.94 R14.1@1811.25,3376.92
NetR27_1: R13.1 U4.46 | length 232.1
  Top Layer w10: U4.46@1716.27,3562.89 1717.14,3562.02 1717.14,3486.55 1764.68,3439.01 1764.68,3388.3 1758.83,3382.45 1738.14,3382.45 R13.1@1732.12,3376.42
NetR29_2: BOOTSEL1.2 R24.2 | length 153.3
  Top Layer w10: BOOTSEL1.2@2259.35,2986.14 BOOTSEL1.2@2259.35,3007.43 ; BOOTSEL1.2@2259.96,3007.43 2259.96,3021.57 2270.71,3032.32 2284.85,3032.32 2329.31,3076.77 2329.31,3091.43 R24.2@2337.06,3099.18
NetR30_2: R21.2 SW1.2 | length 61.2
  Top Layer w6: SW1.2@2002.14,3954.51 2002.14,3950.78 2015.29,3937.63 2023.77,3937.63 2031.02,3930.38 2031.02,3927.36 2040.98,3917.4 R21.2@2044,3917.4
NetR40_2: R31.2 U7.4 | length 96.6
  Top Layer w25: R31.2@3133.25,4206.34 U7.4@3229.87,4206.34
NetR44_2: R4.2 U1.19 | length 157.9
  Top Layer w15: R4.2@1127.86,3765.79 1127.86,3697.34 1179.92,3645.29 1189.37,3645.29 1190.9,3646.81 U1.19@1195.12,3646.81
NetR47_2: R3.2 U1.1 | length 88.3
  Top Layer w15: R3.2@899.47,3769.55 899.47,3701.12 903.78,3696.81 U1.1@917.57,3696.81
QSPI_SCLK: U4.52 U5.6 | length 434.5
  Top Layer w6: U4.52@1810.76,3562.89 1811.69,3561.96 1811.69,3548.67 1814.57,3545.79 1814.57,3542.35 1850.92,3506 1851.5,3506 1852.83,3504.67 1900.89,3504.67 2016.95,3388.6 2016.95,3355.53 2083.09,3289.4 U5.6@2102.77,3289.4
QSPI_SD0: U4.53 U5.5 | length 378.6
  Top Layer w6: U4.53@1826.51,3562.89 1827.44,3561.96 1827.44,3548.67 1830.32,3545.79 1830.32,3542.35 1855.67,3517 1856.05,3517 1857.39,3515.67 1905.44,3515.67 2042.27,3378.84 2043.65,3378.84 2083.09,3339.4 U5.5@2102.77,3339.4
QSPI_SD1: U4.55 U5.2 | length 826.8
  Top Layer w6: U4.55@1858,3562.89 1858.94,3561.96 1858.94,3548.67 1861.81,3545.79 1861.81,3542.35 1866.5,3537.67 1915.28,3537.67 2052.11,3400.84 2408.09,3400.84 2429.57,3379.36 2429.57,3263.05 2405.92,3239.4 U5.2@2386.24,3239.4
QSPI_SD2: U4.54 U5.3 | length 667.1
  Top Layer w6: U4.54@1842.25,3562.89 1843.19,3561.96 1843.19,3548.67 1846.06,3545.79 1846.06,3542.35 1860.42,3528 1860.61,3528 1861.94,3526.67 1910.72,3526.67 2047.55,3389.84 2266.11,3389.84 2366.55,3289.4 U5.3@2386.24,3289.4
QSPI_SD3: U4.51 U5.7 | length 491.1
  Top Layer w6: U4.51@1795.01,3562.89 1795.01,3549.61 1798.82,3545.79 1798.82,3545.15 1798.82,3542.35 1846.18,3495 1846.94,3495 1848.27,3493.67 1896.33,3493.67 2005.95,3384.05 2005.95,3316.53 2062.29,3260.2 2083.09,3239.4 U5.7@2102.77,3239.4
QSPI_SS: R24.1 U4.56 U5.1 | length 969.9
  Top Layer w6: U4.56@1873.75,3562.89 1873.75,3549.61 1874.69,3548.67 1919.84,3548.67 2056.66,3411.84 2413.26,3411.84 2440.57,3384.53 2440.57,3224.05 2405.92,3189.4 2390.34,3189.4 U5.1@2386.24,3189.4
  Top Layer w10: U5.1@2386.24,3189.4 2390.34,3185.29 2390.34,3110.17 2390.73,3109.78 2390.34,3109.38 R24.1@2390.34,3099.18
RPM_BACK_LEFT: R36.2 R37.1 RPM_BL.2 | length 846.8
  Top Layer w10: R36.2@3370,4987.12 3370,5083.29 R37.1@3370.37,5083.66 3370.37,5144.63 3199.76,5315.24 3199.76,5461.26 3236.89,5498.39 3396.61,5498.39 RPM_BL.2@3460,5435
RPM_BACK_RIGHT: R39.2 R40.1 RPM_BR.2 | length 1580.9
  Top Layer w6: R40.1@3485,5090 3490.74,5084.26 R40.1@3490.74,5083.66
  Top Layer w10: R40.1@3485,5090 3485,5090.4 3214.76,5360.64 3214.76,5455.04 3243.11,5483.39 3337.56,5483.39 3434.34,5386.61 3528.79,5386.61 3625.57,5483.39 4053.46,5483.39 RPM_BR.2@4101.85,5435 ; R39.2@3490.37,4987.12 R40.1@3490.37,5083.29
RPM_FRONT_LEFT: R45.2 R49.1 RPM_FL.2 | length 1006.3
  Top Layer w10: R45.2@4233.83,4411.49 R49.1@4320.37,4411.49 4488.24,4411.49 4691,4614.24 4700,4623.25 4700,4887.82 4681.27,4906.55 4650,4937.82 RPM_FL.2@4650,5055
RPM_FRONT_RIGHT: R44.2 R48.1 RPM_FR.2 | length 498.1
  Top Layer w10: R44.2@4233.83,4252.53 R48.1@4319.63,4252.53 ; R48.1@4320.37,4251.79 R48.1@4319.63,4252.53 ; RPM_FR.2@4650.41,4446.85 4456.09,4252.53 R48.1@4319.63,4252.53
RUN: SW1.1 U4.26 | length 245
  Top Layer w6: U4.26@1700.52,3833.6 1700.54,3859.83 1705.88,3865.17 1717.92,3865.17 v1(1721.75,3869) ; v1(1827.44,3937.23) 1860.44,3937.23 1867.56,3944.35 1867.56,3960 SW1.1@1868.68,3960
  Bottom Layer w6: v1(1721.75,3869) 1722.58,3869.83 1760.04,3869.83 v1(1827.44,3937.23)
STEER_GND: D8.2 Q3.3 ST_PWR.1 | length 822
  Top Layer w40: D8.2@4275.41,3929.59 4285.41,3929.59 4290.41,3934.59 4330.94,3894.06 Q3.3@4330.94,3798.96 4357.59,3772.31 4675.44,3772.31 4710.84,3807.71 4710.84,3969.16 ST_PWR.1@4650.41,4029.59
STEER_POWER: D8.1 F2.2 ST_PWR.2 | length 550
  Top Layer w40: F2.2@4191.12,4052.54 D8.1@4275.41,4052.54 ; D8.1@4275.41,4051.64 4333.52,4051.64 4552.42,3832.74 ST_PWR.2@4650.41,3832.74
SteerAngle: R9.2 ST_SENSE.2 | length 3252
  Top Layer w10: v1(1455.25,3581.04) 1456.25,3582.04 1482.5,3582.04 1494.32,3593.87 R9.2@1494.32,3594.88 ; v1(2363.7,2975) 3380.97,2975 3514.36,3108.39 3663.19,3108.39 3759.96,3011.61 4026.28,3011.61 4074.67,3060 ST_SENSE.2@4191.85,3060
  Bottom Layer w10: v1(1455.25,3581.04) 1455.25,3473.9 1509.23,3419.92 2003.38,2925.77 2314.47,2925.77 v1(2363.7,2975)
STEP_DIR1: STEER.4 U1.16 | length 652.3
  Top Layer w15: STEER.4@792.63,3779.9 800.8,3779.9 850.91,3830 998.43,3830 1046.72,3781.71 1046.72,3626.27 1171.87,3501.12 1190.81,3501.12 U1.16@1195.12,3496.81
STEP_DIR2: BRAKE.4 U1.7 | length 294.4
  Top Layer w15: BRAKE.4@792.63,3170.89 804.3,3182.56 804.3,3237.59 859.27,3292.55 859.27,3367.05 884.71,3392.5 913.25,3392.5 U1.7@917.57,3396.81
STEP_ENA1: STEER.6 U1.14 | length 1024.1
  Top Layer w15: STEER.6@792.63,4110.6 792.63,4042.37 965,3870 1015,3870 1086.72,3798.28 1086.72,3642.84 1107.06,3622.5 1227.38,3622.5 1236.17,3613.71 1236.17,3421.12 1211.86,3396.81 U1.14@1195.12,3396.81
STEP_ENA2: BRAKE.6 U1.5 | length 142.7
  Top Layer w6: U1.5@903.78,3501.59 908.57,3496.81 U1.5@917.57,3496.81
  Top Layer w15: BRAKE.6@792.63,3501.59 797.42,3496.81 U1.5@917.57,3496.81
STEP_PUL1: STEER.2 U1.18 | length 1196.5
  Top Layer w15: STEER.2@576.1,3945.25 509.46,3878.62 509.46,3720.58 516.79,3713.26 635.57,3713.26 639.96,3717.66 640.17,3717.87 757.82,3845.18 762.64,3850 1006.72,3850 1066.72,3789.99 1066.72,3634.55 1104.46,3596.81 U1.18@1195.12,3596.81
STEP_PUL2: BRAKE.2 U1.9 | length 814
  Top Layer w15: BRAKE.2@576.1,3336.24 509.46,3269.61 509.46,3111.57 516.79,3104.25 820.23,3104.25 859.27,3143.28 859.27,3264.27 887.5,3292.5 913.25,3292.5 U1.9@917.57,3296.81
SWCLK: U4.24
SWDIO: U4.25
USB_N: PICO.A7 PICO.B7 R13.2 | length 303.2
  Top Layer w10: R13.2@1732.12,3317.37 1738.14,3311.34 1758.83,3311.34 1764.68,3305.49 1764.68,3269.59 1824.65,3209.62 1824.65,3197.63 ; 1824.65,3197.61 1824.65,3178.77 1821.81,3175.93 PICO.B7@1821.81,3159.2 1822.71,3158.29 1822.71,3135.29 1831.44,3126.56 1851.54,3126.56 1860.27,3135.29 1860.27,3158.29 PICO.A7@1861.18,3159.2
USB_P: PICO.A6 PICO.B6 R14.2 | length 279
  Top Layer w10: R14.2@1811.25,3317.86 1805.23,3311.84 1784.54,3311.84 1778.68,3305.98 1778.68,3275.39 1838.65,3215.42 1838.65,3191.83 ; PICO.A6@1841.49,3159.2 1841.49,3175.93 1840.59,3176.83 1840.59,3180.75 1838.65,3182.69 1838.65,3191.83 ; PICO.B6@1880.86,3159.2 1879.96,3176.83 1879.62,3183.44 1871.22,3191.83 1838.65,3191.83
VCC: C31.2 D5.1 D5.@2550.84,5279.4 D5.@2593.17,5279.4 U6.16 | length 249
  Top Layer w18: U6.16@2424.62,5383.8 2424.76,5383.66 2462.91,5383.66 2465.59,5380.98 2509.14,5380.98 2550.84,5339.28 D5.@2550.84,5279.4 ; D5.1@2572.01,5269.56 2574.64,5266.92 C31.2@2574.64,5226.23
XIN: C15.2 U4.20 X1.1 | length 332.7
  Top Layer w6: X1.1@1566.13,3988.59 1571.42,3983.3 1709.98,3983.3 1739.89,3953.39 1739.89,3947.48 1751.65,3935.72 1754.61,3935.72 1795.01,3895.32 U4.20@1795.01,3833.6
XOUT: R10.2 U4.21 | length 167.1
  Top Layer w6: R10.2@1681.58,3950.44 1681.58,3947.42 1691.77,3937.23 1708.57,3937.23 1778.32,3867.48 1778.32,3834.54 U4.21@1779.26,3833.6
pads on no net: +5V.A6 +5V.A7 +5V.A8 +5V.B6 +5V.B7 +5V.B8 BRAKE. PICO.A8 PICO.B8 STEER. U1.3 U1.8 U1.12 U1.17

## Polygon pours and split planes (outlines as drawn)
+24 on Top Layer "+24_L01_P003" (solid, pour order 3): 2154.91,5264.71 2215.93,5264.71 2215.93,5215.12 2215.93,4864.07 2290,4790 2290,4692.63 2367.85,4610.68 2885.68,4610.68 3065,4790 3760,4790 3882.48,4667.52 4005,4667.52 4005,4190 4103.32,4091.68 4103.32,3596.72 3775,3596.72 3775,4250 3820,4295 3820,4525 3780,4565 3160,4565 3108.8,4513.8 3110,4390 2260.56,4390 2111.94,4538.61 2111.94,4950.36 2111.94,5221.74
+12 on Top Layer "+12_L01_P005" (solid, pour order 5): 4118.94,4582.48 4320,4582.48 4320,4885 3860,4885 3795,4950 3795,5220 3690,5220 3670,5200 3670,4905 3888.94,4686.06 4118.94,4686.06
+5 on Top Layer "+5_L01_P004" (solid, pour order 4): 600.47,4050 742.21,4191.74 1308.26,4191.74 1444.99,4055.01 1965,4055 2200,3820 2833.07,3820 3559.78,3820 3694.34,3954.56 3694.34,4065 2825,4065 2770,4010 2255,4010 2040,4225 1510,4225 1385,4350 603.91,4350 415,4161.09 415,4130 495,4050
+3V3 on Top Layer "+3V3" (solid, pour order 0): 1283.39,3462.03 1283.39,3387.63 1613.17,3387.63 1655.87,3430.33 1655.87,3462.03
+48 on Top Layer "+48_L01_P002" (solid, pour order 2): 333.8,5019.35 437.16,5122.72 1917.82,5122.72 1948.1,5092.44 1948.1,4935.01 1849.92,4836.83 1551.84,4836.84 1370,4655 462.12,4655 333.8,4783.32
GND on Bottom Layer "GND_L02_P006" (solid, remove dead copper, pour order 6): 0,5600 4810.58,5600 4810.58,2892.01 0,2892.01

## Keep-outs
Keep-Out Layer:
  the board outline again, w10

## Silkscreen, mask and mechanical layers (free items; w line width, h text height)
Top Overlay:
  drawing of 3 lines, arcs and shapes, not listed
  text "Thomas Xin" at 1450,4095 h60
  text "Teleoperation_Board_V1.0" at 2195,3884.99 h60
Mechanical 1:
  lines w10: 0,2892.01 4810.58,2892.01 4810.58,5600 0,5600 0,2892.01